# Altium PCB IC_Card_Access.PcbDoc
Units mil, origin at the board's own origin, x right, y up, seen from the top; angles counter-clockwise.
Board outline 5257.68 x 6780 mil, 2 copper layers (Top Layer, Bottom Layer), stack 62.206 mil thick; 51 components, 52 nets, 246 pads, 142 vias.
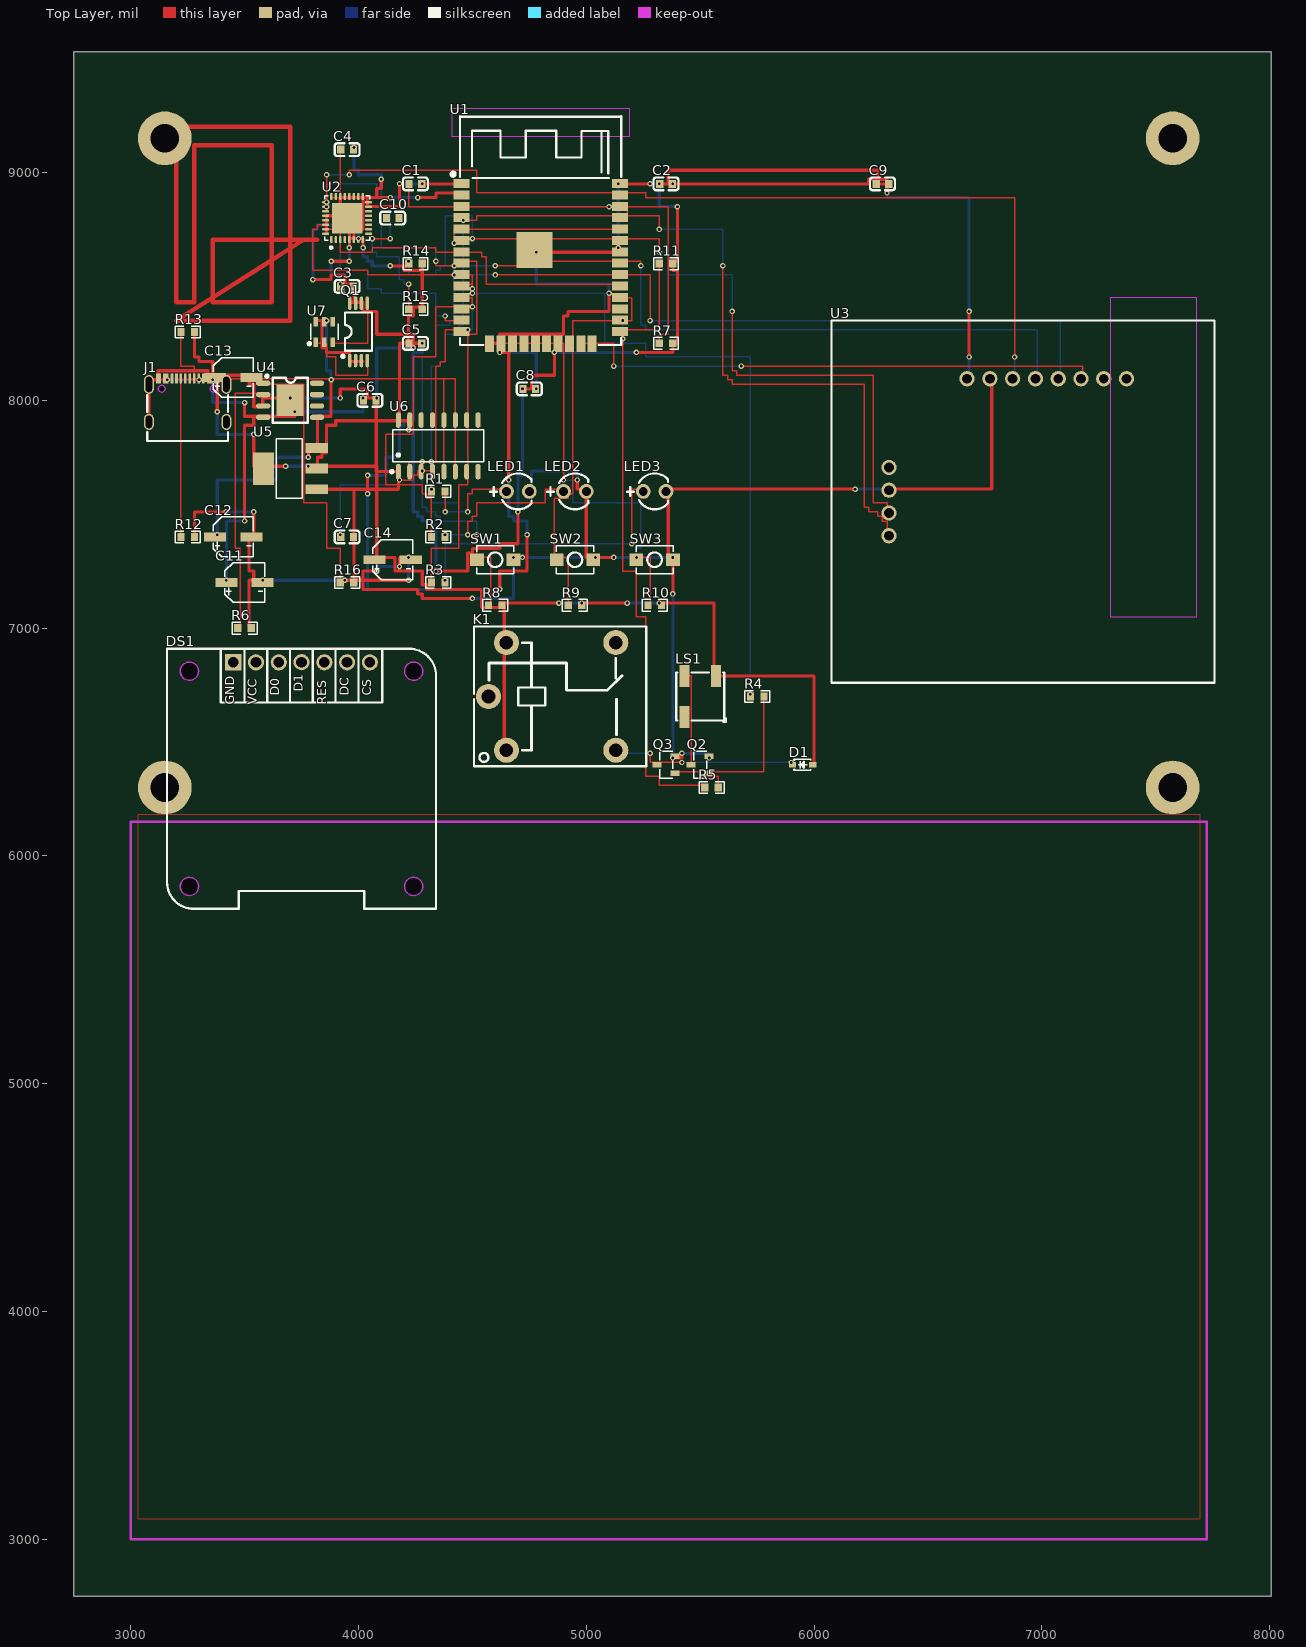
[diagram p0: Top Layer view]
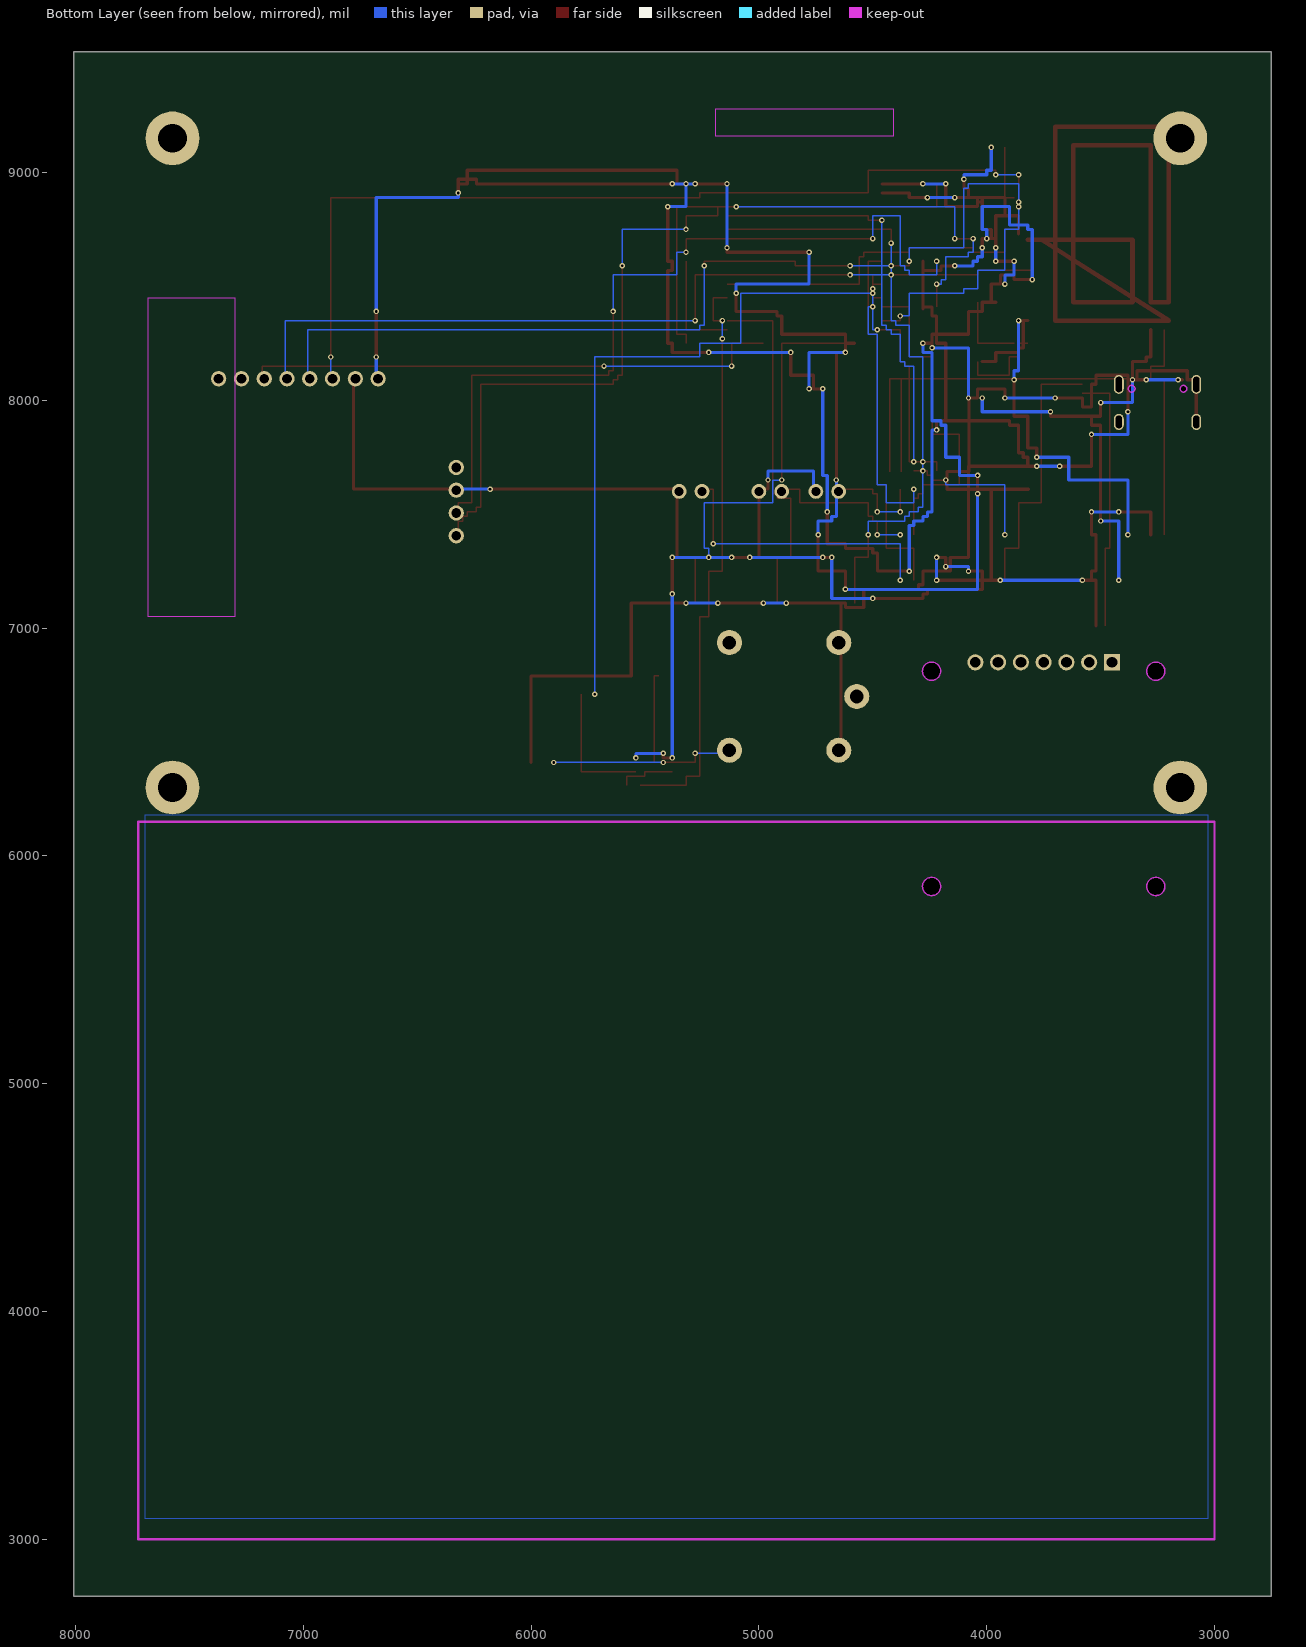
[diagram p1: Bottom Layer view, seen from below]

## Layer stack, top to bottom
Top Solder Mask Layer: solder mask 0.394, Dk 3.3
Top Layer: signal copper 1.379
Dielectric1: surface 59.449, FR4, Dk 4.5
Bottom Layer: signal copper 1.378
Bottom Solder Mask Layer: solder mask 0.394, Dk 3.3

## Board outline
8007.68,2750 2750,2750 2750,9530 8007.68,9530

## Design rules (kind name [scope] priority, off if disabled: settings)
BoardOutlineClearance copperThickness2oz_1 [All] p2 off: genericclearance=7.99 ignorepadtopadclearanceinfootprint=FALSE except(0: Arc-SplitContinuation Track-SplitContinuation SMDPad-SplitContinuation THPad-SplitContinuation Via-SplitContinuation Fill-SplitContinuation Region-SplitContinuation Poly-SplitContinuation Text-SplitContinuation Hole-SplitContinuation; 5.98: Arc-CutoutEdge SMDPad-CutoutEdge THPad-CutoutEdge Via-CutoutEdge Fill-CutoutEdge Region-CutoutEdge Text-CutoutEdge; 6.93: Hole-OutlineEdge Hole-CutoutEdge; 10: Poly-OutlineEdge Poly-CutoutEdge; 11.81: Arc-OutlineEdge Track-OutlineEdge SMDPad-OutlineEdge THPad-OutlineEdge Via-OutlineEdge Fill-OutlineEdge Region-OutlineEdge Text-OutlineEdge Track-CutoutEdge)
BoardOutlineClearance copperThickness1oz_1 [All] p4: genericclearance=4.02 ignorepadtopadclearanceinfootprint=FALSE except(0: Arc-SplitContinuation Track-SplitContinuation SMDPad-SplitContinuation THPad-SplitContinuation Via-SplitContinuation Fill-SplitContinuation Region-SplitContinuation Poly-SplitContinuation Text-SplitContinuation Hole-SplitContinuation; 6: SMDPad-CutoutEdge THPad-CutoutEdge Via-CutoutEdge Fill-CutoutEdge Region-CutoutEdge Text-CutoutEdge; 6.93: Hole-OutlineEdge Hole-CutoutEdge; 10: Poly-OutlineEdge Poly-CutoutEdge; 11.8: Arc-OutlineEdge Track-OutlineEdge SMDPad-OutlineEdge THPad-OutlineEdge Via-OutlineEdge Fill-OutlineEdge Region-OutlineEdge Text-OutlineEdge; 11.81: Arc-CutoutEdge Track-CutoutEdge)
Clearance copperThickness2oz [All] p1 off: gap=7.99 ignorepadtopadclearanceinfootprint=FALSE except(5.98: SMDPad-Track SMDPad-SMDPad THPad-Track SMDPad-THPad THPad-THPad Track-Via SMDPad-Via THPad-Via Via-Via Fill-Track Region-Track Fill-SMDPad Region-SMDPad Fill-THPad Region-THPad Fill-Via Region-Via Fill-Fill Fill-Region Region-Region Arc-Track Arc-SMDPad Arc-THPad Arc-Via Fill-Arc Region-Arc Arc-Arc Text-Track SMDPad-Text Text-THPad Text-Via Fill-Text Region-Text Arc-Text Text-Text; 6.93: Hole-Track Hole-SMDPad Hole-THPad Hole-Via Fill-Hole Region-Hole Hole-Arc Hole-Text; 10: Poly-Track Poly-SMDPad Poly-THPad Poly-Via Poly-Fill Poly-Region Poly-Poly Poly-Arc Poly-Text Poly-Hole)
Clearance copperThickness1oz [All] p3: gap=4.02 ignorepadtopadclearanceinfootprint=FALSE except(5.98: SMDPad-Track SMDPad-SMDPad THPad-Track SMDPad-THPad THPad-THPad Track-Via SMDPad-Via THPad-Via Via-Via Fill-Track Region-Track Fill-SMDPad Region-SMDPad Fill-THPad Region-THPad Fill-Via Region-Via Fill-Fill Fill-Region Region-Region; 6: Arc-Track Arc-SMDPad Arc-THPad Arc-Via Fill-Arc Region-Arc Arc-Arc Text-Track SMDPad-Text Text-THPad Text-Via Fill-Text Region-Text Arc-Text Text-Text; 6.93: Hole-Track Hole-SMDPad Hole-THPad Hole-Via Fill-Hole Region-Hole Hole-Arc Hole-Text; 10: Poly-Track Poly-SMDPad Poly-THPad Poly-Via Poly-Fill Poly-Region Poly-Poly Poly-Arc Poly-Text Poly-Hole)
Creepage creepage [All] p1: checkdistance=0 ignoreinternallayers=TRUE applytopolygonpour=TRUE
DiffPairsRouting differentialPair [All] p1: maxlimit=6 minlimit=6 mostfreqgap=6 toplayer_minwidth=5 toplayer_prefwidth=10 toplayer_maxwidth=100 toplayer_mingap=6 toplayer_prefgap=6 toplayer_maxgap=6 bottomlayer_minwidth=5 bottomlayer_prefwidth=10 bottomlayer_maxwidth=100 bottomlayer_mingap=6 bottomlayer_prefgap=6 bottomlayer_maxgap=6 maxuncoupledlength=10
HoleToHoleClearance otherClearance [All] p1: gap=11.81 allowstackedmicrovias=TRUE
Length netLength [All] p1: minlimit=0 maxlimit=0
MatchedLengths netLengthTolerance [All] p1: tolerance=1000
PasteMaskExpansion pasteMaskExpansion [All] p1: expansion=0
PlaneConnect innerPlane [All] p1: planeconnectstyle=Relief reliefexpansion=20 reliefentries=4 reliefconductorwidth=10 reliefairgap=10
PolygonConnect copperRegion [All] p1: connectstyle=Relief reliefconductorwidth=10 reliefentries=4 polygonreliefangle="90 Angle" airgapwidth=10 via.connectstyle=Relief via.reliefconductorwidth=10 via.reliefentries=4 via.polygonreliefangle="90 Angle" via.airgapwidth=10
RoutingVias viaSize [All] p1: holewidth=12.01 width=24.02 viastyle="Through Hole" minholewidth=11.81 minwidth=19.68 maxholewidth=248.03 maxwidth=393.7
SolderMaskExpansion solderMaskExpansion [IsVia] p1: expansion=-1000 istentingtop=TRUE
SolderMaskExpansion solderMaskExpansion [All] p2: expansion=2 istentingtop=FALSE
Width copperThickness2oz_2 [All] p1 off: maxlimit=100 minlimit=8 preferedwidth=10
Width copperThickness1oz_2 [All] p2: maxlimit=100 minlimit=5 preferedwidth=10

## Components (designator, comment, footprint, x,y, rotation, side; value= is the part's Value field where it differs from the comment)
C1 "100nF" C0603 4250,8950 r0 top
C2 "100nF" C0603 5350,8950 r0 top
C3 "100nF" C0603 3950,8500 r0 top
C4 "100nF" C0603 3950,9100 r0 top
C5 "100nF" C0603 4250,8250 r0 top
C6 "100nF" C0603 4050,8000 r0 top
C7 "100nF" C0603 3950,7400 r0 top
C8 "100nF" C0603 4750,8050 r0 top
C9 "100nF" C0603 6300,8950 r0 top
C10 "15pF" C0603 4150,8800 r0 top
C11 "CAP-SMD 4*5 10uF ±10% 16V" CAP-SMD_BD4.0-L4.3-W4.3-LS5.3-FD 3500,7200 r0 top
C12 "CAP-SMD 4*5 10uF ±10% 16V" CAP-SMD_BD4.0-L4.3-W4.3-LS5.3-FD 3450,7400 r0 top
C13 "CAP-SMD 4*5 10uF ±10% 16V" CAP-SMD_BD4.0-L4.3-W4.3-LS5.3-FD 3450,8100 r0 top
C14 "CAP-SMD 4*5 10uF ±10% 16V" CAP-SMD_BD4.0-L4.3-W4.3-LS5.3-FD 4150,7300 r0 top
D1 "SS14" SOD-323_L1.7-W1.3-LS2.6-RD-1 5950,6400 r0 top
DS1 "JX040102-1" OLED-TH_JX040101-1 3750,6850 r0 top
J1 "UCB11L69P16" TYPE-C-SMD_16P-UCB11L69P16 3250,8000 r0 top
K1 "SRD-03VDC-SL-C" RELAY-TH_SRD-XXVDC-XL-C 4850,6700 r0 top
LED1 "LED" LED-TH_BD4.0-P2.54-FD_RED 4700,7600 r0 top
LED2 "LED" LED-TH_BD4.0-P2.54-FD_RED 4950,7600 r0 top
LED3 "LED" LED-TH_BD4.0-P2.54-FD_RED 5300,7600 r0 top
LS1 "BEEP_SMT" BUZ-SMD_3P-L5.2-W5.2-P3.50-BR 5500,6700 r0 top
Q1 "FS8205A" TSSOP-8_L4.4-W3.0-P0.65-LS6.4-BL-2 4000,8300 r0 top
Q2 "S8050" SOT-23-3_L2.9-W1.3-P1.90-LS2.4-BR 5500,6400 r0 top
Q3 "S8050" SOT-23-3_L2.9-W1.3-P1.90-LS2.4-BR 5350,6400 r0 top
R1 "1k" R0603 4350,7600 r0 top
R2 "1k" R0603 4350,7400 r0 top
R3 "1k" R0603 4350,7200 r0 top
R4 "1k" R0603 5750,6700 r0 top
R5 "1k" R0603 5550,6300 r0 top
R6 "10k" R0603 3500,7000 r0 top
R7 "10k" R0603 5350,8250 r0 top
R8 "10k" R0603 4600,7100 r0 top
R9 "10k" R0603 4950,7100 r0 top
R10 "10k" R0603 5300,7100 r0 top
R11 "10k" R0603 5350,8600 r0 top
R12 "5.1k" R0603 3250,7400 r0 top
R13 "5.1k" R0603 3250,8300 r0 top
R14 "10k" R0603 4250,8600 r0 top
R15 "10k" R0603 4250,8400 r0 top
R16 "10k" R0603 3950,7200 r0 top
SW1 "轻触按键3*4*H" SW-SMD_L4.0-W2.9-LS5.0 4600,7300 r0 top
SW2 "轻触按键3*4*H" SW-SMD_L4.0-W2.9-LS5.0 4950,7300 r0 top
SW3 "轻触按键3*4*H" SW-SMD_L4.0-W2.9-LS5.0 5300,7300 r0 top
U1 "ESP32-WROOM-32" WIFIM-SMD_ESP-WROOM-32 4800,8600 r0 top
U2 "13.56MHz" QFN-32_L5.0-W5.0-P0.50-BL-EP3.4 3950,8800 r0 top
U3 "PN532 NFC RFID Module v4" COMM-TH_L42.7-W40.4_PN532_NFC_RFID 6850,7750 r0 top
U4 "TP4056X-42-ESOP8" SOP-8_L4.9-W3.9-P1.27-LS6.0-TL-EP 3700,8000 r0 top
U5 "AMS1117-3.3V" SOT-223-3_L6.5-W3.4-P2.30-LS7.0-BR 3700,7700 r0 top
U6 "CH340C" SOP-16_L10.0-W3.9-P1.27-LS6.0-BL 4350,7800 r0 top
U7 "DW01" SOT-23-6_L2.9-W1.6-P0.95-LS2.8-BL 3850,8300 r0 top

## Footprints (in the part's own frame and the unit in brackets; to place one, negate y for a bottom-side part, rotate by r counter-clockwise, add the part's x,y. Pads: shape width x height; smd on the part's side, far side on the other; paste and mask are expansions set on the pad)
BUZ-SMD_3P-L5.2-W5.2-P3.50-BR [mm]
  rect 1.12x2.425 smd: 1(1.75,2.288) 2(-1.75,2.288) 3(-1.75,-2.288)
  silkscreen extent -2.68,-2.9 2.9,2.68
C0603 [mm]
  rect 0.8x0.9 smd: 1(-0.7,0) 2(0.7,0)
  silkscreen extent -1.39,-0.71 1.39,0.71
CAP-SMD_BD4.0-L4.3-W4.3-LS5.3-FD [mm]
  rect 2.46x0.98 smd: 1(-2.02,0) 2(2.02,0)
  silkscreen extent -2.23,-2.23 2.23,2.23
COMM-TH_L42.7-W40.4_PN532_NFC_RFID [mm]
  round 1.7 hole 1.1: 1(-4.535,8.755) 2(-1.995,8.755) 3(0.545,8.755) 4(3.085,8.755) 5(5.625,8.755) 6(8.165,8.755) 7(10.705,8.755) 8(13.245,8.755) 9(-13.245,-1.135) 10(-13.245,-3.675) 11(-13.245,-6.215) 12(-13.245,-8.755)
  silkscreen extent -19.64,-25.14 23.05,15.25
LED-TH_BD4.0-P2.54-FD_RED [mil]
  round 65 hole 39.37: 1(-50,0) 2(50,0)
  silkscreen extent -122,-79 59,79
OLED-TH_JX040101-1 [mm]
  rect 1.8x1.8 hole 1.2 paste+0 mask+0.05: 1(-7.619,0.001)
  round 1.8 hole 1.2 paste+0 mask+0.05: 2(-5.079,-0.004) 3(-2.539,-0.004) 4(0.001,0.004) 5(2.539,-0.001) 6(5.079,-0.001) 7(7.619,-0.004)
  Board Outline Layer circle w0.003: c-12.501,-24.997 r1.016
  Board Outline Layer circle w0.003: c12.498,-24.997 r1.016
  Board Outline Layer circle w0.003: c12.498,-0.997 r1.016
  Board Outline Layer circle w0.003: c-12.501,-0.997 r1.016
  Board Outline Layer region: -11.485,-24.997 -11.585,-25.438 -11.867,-25.792 -12.275,-25.988 -12.727,-25.988 -13.134,-25.792 -13.416,-25.438 -13.517,-24.997 -13.517,-24.997 -13.416,-24.557 -13.134,-24.203 -12.727,-24.007 -12.275,-24.007 -11.867,-24.203 -11.585,-24.557 -11.485,-24.997
  Board Outline Layer region: -11.485,-24.997 -11.494,-25.136 -11.522,-25.272 -11.569,-25.402 -11.633,-25.525 -11.712,-25.639 -11.807,-25.74 -11.915,-25.827 -12.033,-25.9 -12.16,-25.955 -12.294,-25.992 -12.431,-26.011 -12.57,-26.011 -12.707,-25.992 -12.841,-25.955 -12.968,-25.9 -13.087,-25.827 -13.194,-25.74 -13.289,-25.639 -13.369,-25.525 -13.432,-25.402 -13.479,-25.272 -13.507,-25.136 -13.517,-24.997 -13.507,-24.859 -13.479,-24.723 -13.432,-24.593 -13.369,-24.47 -13.289,-24.356 -13.194,-24.255 -13.087,-24.167 -12.968,-24.095 -12.841,-24.04 -12.707,-24.003 -12.57,-23.984 -12.431,-23.984 -12.294,-24.003 -12.16,-24.04 -12.033,-24.095 -11.915,-24.167 -11.807,-24.255 -11.712,-24.356 -11.633,-24.47 -11.569,-24.593 -11.522,-24.723 -11.494,-24.859
  Board Outline Layer region: 13.514,-24.997 13.413,-25.438 13.132,-25.792 12.724,-25.988 12.272,-25.988 11.865,-25.792 11.583,-25.438 11.482,-24.997 11.482,-24.997 11.583,-24.557 11.865,-24.203 12.272,-24.007 12.724,-24.007 13.132,-24.203 13.413,-24.557 13.514,-24.997
  Board Outline Layer region: 13.514,-24.997 13.505,-25.136 13.476,-25.272 13.43,-25.402 13.366,-25.525 13.286,-25.639 13.192,-25.74 13.084,-25.827 12.965,-25.9 12.838,-25.955 12.705,-25.992 12.567,-26.011 12.429,-26.011 12.291,-25.992 12.158,-25.955 12.031,-25.9 11.912,-25.827 11.805,-25.74 11.71,-25.639 11.63,-25.525 11.566,-25.402 11.52,-25.272 11.492,-25.136 11.482,-24.997 11.492,-24.859 11.52,-24.723 11.566,-24.593 11.63,-24.47 11.71,-24.356 11.805,-24.255 11.912,-24.167 12.031,-24.095 12.158,-24.04 12.291,-24.003 12.429,-23.984 12.567,-23.984 12.705,-24.003 12.838,-24.04 12.965,-24.095 13.084,-24.167 13.192,-24.255 13.286,-24.356 13.366,-24.47 13.43,-24.593 13.476,-24.723 13.505,-24.859
  Board Outline Layer region: 13.514,-0.997 13.413,-1.438 13.132,-1.791 12.724,-1.987 12.272,-1.987 11.865,-1.791 11.583,-1.438 11.482,-0.997 11.482,-0.997 11.583,-0.556 11.865,-0.203 12.272,-0.006 12.724,-0.006 13.132,-0.203 13.413,-0.556 13.514,-0.997
  Board Outline Layer region: 13.514,-0.997 13.505,-1.135 13.476,-1.271 13.43,-1.402 13.366,-1.525 13.286,-1.638 13.192,-1.739 13.084,-1.827 12.965,-1.899 12.838,-1.954 12.705,-1.992 12.567,-2.011 12.429,-2.011 12.291,-1.992 12.158,-1.954 12.031,-1.899 11.912,-1.827 11.805,-1.739 11.71,-1.638 11.63,-1.525 11.566,-1.402 11.52,-1.271 11.492,-1.135 11.482,-0.997 11.492,-0.859 11.52,-0.723 11.566,-0.592 11.63,-0.469 11.71,-0.356 11.805,-0.254 11.912,-0.167 12.031,-0.095 12.158,-0.04 12.291,-0.002 12.429,0.017 12.567,0.017 12.705,-0.002 12.838,-0.04 12.965,-0.095 13.084,-0.167 13.192,-0.254 13.286,-0.356 13.366,-0.469 13.43,-0.592 13.476,-0.723 13.505,-0.859
  Board Outline Layer region: -11.485,-0.997 -11.585,-1.438 -11.867,-1.791 -12.275,-1.987 -12.727,-1.987 -13.134,-1.791 -13.416,-1.438 -13.517,-0.997 -13.517,-0.997 -13.416,-0.556 -13.134,-0.203 -12.727,-0.006 -12.275,-0.006 -11.867,-0.203 -11.585,-0.556 -11.485,-0.997
  Board Outline Layer region: -11.485,-0.997 -11.494,-1.135 -11.522,-1.271 -11.569,-1.402 -11.633,-1.525 -11.712,-1.638 -11.807,-1.739 -11.915,-1.827 -12.033,-1.899 -12.16,-1.954 -12.294,-1.992 -12.431,-2.011 -12.57,-2.011 -12.707,-1.992 -12.841,-1.954 -12.968,-1.899 -13.087,-1.827 -13.194,-1.739 -13.289,-1.638 -13.369,-1.525 -13.432,-1.402 -13.479,-1.271 -13.507,-1.135 -13.517,-0.997 -13.507,-0.859 -13.479,-0.723 -13.432,-0.592 -13.369,-0.469 -13.289,-0.356 -13.194,-0.254 -13.087,-0.167 -12.968,-0.095 -12.841,-0.04 -12.707,-0.002 -12.57,0.017 -12.431,0.017 -12.294,-0.002 -12.16,-0.04 -12.033,-0.095 -11.915,-0.167 -11.807,-0.254 -11.712,-0.356 -11.633,-0.469 -11.569,-0.592 -11.522,-0.723 -11.494,-0.859
  Multi-Layer board cut-out: -11.485,-24.997 -11.585,-25.438 -11.867,-25.792 -12.275,-25.988 -12.727,-25.988 -13.134,-25.792 -13.416,-25.438 -13.517,-24.997 -13.517,-24.997 -13.416,-24.557 -13.134,-24.203 -12.727,-24.007 -12.275,-24.007 -11.867,-24.203 -11.585,-24.557 -11.485,-24.997
  Multi-Layer board cut-out: 13.514,-24.997 13.413,-25.438 13.132,-25.792 12.724,-25.988 12.272,-25.988 11.865,-25.792 11.583,-25.438 11.482,-24.997 11.482,-24.997 11.583,-24.557 11.865,-24.203 12.272,-24.007 12.724,-24.007 13.132,-24.203 13.413,-24.557 13.514,-24.997
  Multi-Layer board cut-out: 13.514,-0.997 13.413,-1.438 13.132,-1.791 12.724,-1.987 12.272,-1.987 11.865,-1.791 11.583,-1.438 11.482,-0.997 11.482,-0.997 11.583,-0.556 11.865,-0.203 12.272,-0.006 12.724,-0.006 13.132,-0.203 13.413,-0.556 13.514,-0.997
  Multi-Layer board cut-out: -11.485,-0.997 -11.585,-1.438 -11.867,-1.791 -12.275,-1.987 -12.727,-1.987 -13.134,-1.791 -13.416,-1.438 -13.517,-0.997 -13.517,-0.997 -13.416,-0.556 -13.134,-0.203 -12.727,-0.006 -12.275,-0.006 -11.867,-0.203 -11.585,-0.556 -11.485,-0.997
  silkscreen extent -15,-27.5 15,1.5
QFN-32_L5.0-W5.0-P0.50-BL-EP3.4 [mm]
  oval 0.28x0.8 smd paste+0 mask+0.05: 1(-1.75,-2.4) 2(-1.25,-2.4) 3(-0.75,-2.4) 4(-0.25,-2.4) 5(0.25,-2.4) 6(0.75,-2.4) 7(1.25,-2.4) 8(1.75,-2.4) 17(1.75,2.4) 18(1.25,2.4) 19(0.75,2.4) 20(0.25,2.4) 21(-0.25,2.4) 22(-0.75,2.4) 23(-1.25,2.4) 24(-1.75,2.4)
  oval 0.8x0.28 smd paste+0 mask+0.05: 9(2.4,-1.75) 10(2.4,-1.25) 11(2.4,-0.75) 12(2.4,-0.25) 13(2.4,0.25) 14(2.4,0.75) 15(2.4,1.25) 16(2.4,1.75) 25(-2.4,1.75) 26(-2.4,1.25) 27(-2.4,0.75) 28(-2.4,0.25) 29(-2.4,-0.25) 30(-2.4,-0.75) 31(-2.4,-1.25) 32(-2.4,-1.75)
  rect 3.4x3.4 smd paste+0 mask+0.05: 33(0,0)
  silkscreen extent -2.5,-3.43 2.5,2.5
R0603 [mil]
  rect 31.75x34.02 smd paste-3937.01 mask+2: 1(-29.66,0) 2(29.66,0)
  silkscreen extent -55,-26 55,26
RELAY-TH_SRD-XXVDC-XL-C [mil]
  round 110 hole 60: 1(-200.79,-236.22) 2(279.52,-236.2) 3(279.53,236.2) 4(-200.79,236.22) 5(-279.53,0)
  silkscreen extent -342,-307 413,307
SOD-323_L1.7-W1.3-LS2.6-RD-1 [mm]
  rect 0.83x0.63 smd paste+0 mask+0.05: 1(-1.14,0) 2(1.14,0)
  silkscreen extent -1.02,-0.64 0.89,0.64
SOP-8_L4.9-W3.9-P1.27-LS6.0-TL-EP [mm]
  oval 1.6x0.6 smd: 1(-3,1.905) 2(-3,0.635) 3(-3,-0.635) 4(-3,-1.905) 5(3,-1.905) 6(3,-0.635) 7(3,0.635) 8(3,1.905)
  rect 3x3.5 smd: 9(0,0)
  silkscreen extent -2.74,-2.5 1.95,2.84
SOP-16_L10.0-W3.9-P1.27-LS6.0-BL [mm]
  oval 0.56x1.745 smd: 1(-4.445,-2.872) 2(-3.175,-2.872) 3(-1.905,-2.872) 4(-0.635,-2.872) 5(0.635,-2.872) 6(1.905,-2.872) 7(3.175,-2.872) 8(4.445,-2.872) 9(4.445,2.872) 10(3.175,2.872) 11(1.905,2.872) 12(0.635,2.872) 13(-0.635,2.872) 14(-1.905,2.872) 15(-3.175,2.872) 16(-4.445,2.872)
  silkscreen extent -5.33,-3.02 5.08,1.77
SOT-23-3_L2.9-W1.3-P1.90-LS2.4-BR [mm]
  rect 1x0.65 smd: 1(1,-0.95) 2(1,0.95) 3(-1,0)
  silkscreen extent -0.73,-1.53 0.73,1.53
SOT-23-6_L2.9-W1.6-P0.95-LS2.8-BL [mil]
  rect 20.95x42.2 smd: 1(-37.4,-45.24) 2(0,-45.24) 3(37.4,-45.24) 4(37.4,45.24) 5(0,45.24) 6(-37.4,45.24)
  silkscreen extent -72,-57 61,35
SOT-223-3_L6.5-W3.4-P2.30-LS7.0-BR [mm]
  rect 2.5x1.1 smd: 1(2.97,-2.3) 2(2.97,0) 3(2.97,2.3)
  rect 2.34x3.6 smd: 4(-2.97,0)
  silkscreen extent -1.57,-3.33 1.37,3.33
SW-SMD_L4.0-W2.9-LS5.0 [mm]
  rect 1.53x1.36 smd: 1(-2.035,0) 2(2.035,0)
  silkscreen extent -2.08,-1.58 2.08,1.58
TSSOP-8_L4.4-W3.0-P0.65-LS6.4-BL-2 [mm]
  oval 0.4x1.5 smd: 1(-0.975,-3.2) 2(-0.325,-3.2) 3(0.325,-3.2) 4(0.975,-3.2) 5(0.975,3.2) 6(0.325,3.2) 7(-0.325,3.2) 8(-0.975,3.2)
  silkscreen extent -1.89,-2.87 1.5,2.16
TYPE-C-SMD_16P-UCB11L69P16 [mm]
  oval 1.1x1.8 hole 0.7 slot 1.4 at 90 deg: 1(-4.32,-2.416) 1(4.32,-2.416)
  oval 1.1x2.1 hole 0.7 slot 1.7 at 90 deg: 1(-4.32,1.764) 1(4.32,1.764)
  rect 0.3x1.14 smd paste-100 mask+0.051: A1(-3.4,2.415) A4(-2.6,2.415) A5(-1.25,2.415) A6(-0.25,2.415) A7(0.25,2.415) A8(1.25,2.416) A9(2.6,2.415) A12(3.4,2.415) B1(3.1,2.415) B4(2.3,2.415) B5(1.75,2.415) B6(0.75,2.415) B7(-0.75,2.415) B8(-1.75,2.416) B9(-2.3,2.415) B12(-3.1,2.415)
  Board Outline Layer circle w0.003: c-2.89,1.285 r0.375
  Board Outline Layer circle w0.003: c2.89,1.285 r0.375
  Board Outline Layer region: -2.515,1.285 -2.552,1.122 -2.656,0.991 -2.807,0.919 -2.973,0.919 -3.124,0.991 -3.228,1.122 -3.265,1.285 -3.265,1.285 -3.228,1.447 -3.124,1.578 -2.973,1.65 -2.807,1.65 -2.656,1.578 -2.552,1.447 -2.515,1.285
  Board Outline Layer region: -2.515,1.285 -2.524,1.201 -2.552,1.122 -2.597,1.051 -2.656,0.991 -2.727,0.947 -2.807,0.919 -2.89,0.91 -2.973,0.919 -3.053,0.947 -3.124,0.991 -3.183,1.051 -3.228,1.122 -3.256,1.201 -3.265,1.285 -3.256,1.368 -3.228,1.447 -3.183,1.518 -3.124,1.578 -3.053,1.622 -2.973,1.65 -2.89,1.66 -2.807,1.65 -2.727,1.622 -2.656,1.578 -2.597,1.518 -2.552,1.447 -2.524,1.368
  Board Outline Layer region: 3.265,1.285 3.228,1.122 3.124,0.991 2.973,0.919 2.807,0.919 2.656,0.991 2.552,1.122 2.515,1.285 2.515,1.285 2.552,1.447 2.656,1.578 2.807,1.65 2.973,1.65 3.124,1.578 3.228,1.447 3.265,1.285
  Board Outline Layer region: 3.265,1.285 3.256,1.201 3.228,1.122 3.183,1.051 3.124,0.991 3.053,0.947 2.973,0.919 2.89,0.91 2.807,0.919 2.727,0.947 2.656,0.991 2.597,1.051 2.552,1.122 2.524,1.201 2.515,1.285 2.524,1.368 2.552,1.447 2.597,1.518 2.656,1.578 2.727,1.622 2.807,1.65 2.89,1.66 2.973,1.65 3.053,1.622 3.124,1.578 3.183,1.518 3.228,1.447 3.256,1.368
  Multi-Layer board cut-out: -2.515,1.285 -2.552,1.122 -2.656,0.991 -2.807,0.919 -2.973,0.919 -3.124,0.991 -3.228,1.122 -3.265,1.285 -3.265,1.285 -3.228,1.447 -3.124,1.578 -2.973,1.65 -2.807,1.65 -2.656,1.578 -2.552,1.447 -2.515,1.285
  Multi-Layer board cut-out: 3.265,1.285 3.228,1.122 3.124,0.991 2.973,0.919 2.807,0.919 2.656,0.991 2.552,1.122 2.515,1.285 2.515,1.285 2.552,1.447 2.656,1.578 2.807,1.65 2.973,1.65 3.124,1.578 3.228,1.447 3.265,1.285
  silkscreen extent -4.5,-4.54 4.5,0.58
WIFIM-SMD_ESP-WROOM-32 [mm]
  rect 1.8x1.001 smd: 1(-8.851,8.93) 2(-8.851,7.66) 3(-8.851,6.39) 4(-8.851,5.12) 5(-8.851,3.85) 6(-8.851,2.58) 7(-8.851,1.31) 8(-8.851,0.04) 9(-8.851,-1.23) 10(-8.851,-2.5) 11(-8.851,-3.77) 12(-8.851,-5.04) 13(-8.851,-6.31) 14(-8.851,-7.58) 25(8.851,-7.58) 26(8.851,-6.31) 27(8.851,-5.04) 28(8.851,-3.77) 29(8.851,-2.5) 30(8.851,-1.23) 31(8.851,0.04) 32(8.851,1.31) 33(8.851,2.58) 34(8.851,3.85) 35(8.851,5.12) 36(8.851,6.39) 37(8.851,7.66) 38(8.851,8.93)
  rect 1.001x1.8 smd: 15(-5.69,-8.93) 16(-4.42,-8.93) 17(-3.15,-8.93) 18(-1.88,-8.93) 19(-0.61,-8.93) 20(0.66,-8.93) 21(1.93,-8.93) 22(3.2,-8.93) 23(4.47,-8.93) 24(5.74,-8.93)
  rect 4x4 smd: 39(-0.7,1.52)
  silkscreen extent -9.97,-9.08 8.99,16.42

## Free pads (board coordinates)
  round 236 hole 126 unplated: H1(3150,6300) H2(7574,6300) H3(3150,9150) H4(7574,9150)

## Via types
v1: diameter 24, hole 12, Top Layer to Bottom Layer, 142 vias

## Nets (pads, with @x,y where several pads share a name; then routed paths per layer and width w, separated by ;. In a path a pad name is that pad's centre, name@x,y a point inside that pad or via, vN(x,y) a via of type N, cw(c..) or ccw(c..) an arc to the next point about the centre after c; other vN are vias at no path point)
+3V3: C2.1 C3.1 C5.1 C8.1 C9.1 C13.1 C14.1 D1.2 K1.1 LS1.1 R7.2 R8.2 R9.2 R10.2 R11.2 R14.2 R15.2 U1.2 U2.6 U2.16 U2.17 U2.19 U3.1 U5.2 U5.4 U6.16 | length 13960
  Top Layer w14: v1(3380,7950) C13.1@3380,8110 ; v1(3540,7850) 3540,7710 3580,7710 v1(3680,7710) ; v1(3780,7710) U5.2@3820,7710 ; v1(3880,8610) v1(3960,8610) ; v1(3960,8670) 3960,8710 U2.6@3980,8710 ; U2.19@3980,8890 4020,8890 4020,8870 ; v1(4020,8670) 4020,8710 U2.6@3980,8710 ; v1(4140,8590) 4200,8590 4200,8570 4279.7,8570 ; v1(4140,8890) 4040,8890 4040,8870 4020,8870 ; v1(4220,7870) 4220,7910 U6.16@4180,7910 ; v1(4260,8890) 4340,8890 4340,8910 U1.2@4460,8910 ; R15.2 R15.2@4279.7,8410 ; R14.2 4279.7,8570 ; R15.2@4280,8410 R15.2@4279.7,8410 ; R14.2@4280,8610 4280,8570 4279.7,8570 ; v1(4340,7250) 4480,7250 4480,7330 4500,7330 4500,7350 4620,7350 4620,7370 4700,7370 v1(4700,7510) ; K1.1@4640,6470 R8.2@4640,7110 ; v1(4720,8050) 4760,8050 4760,8110 4860,8110 v1(4860,8210) ; v1(4880,7110) R8.2@4640,7110 ; v1(4980,7110) v1(5180,7110) ; v1(5220,8210) 5380,8210 5380,8250 5400,8250 5400,8570 5380,8570 5380,8610 5400,8610 v1(5400,8850) ; v1(5320,7110) 5560,7110 5560,6790 6000,6790 D1.2@6000,6410 ; v1(5320,8950) 5360,8950 5360,9010 6280,9010 6280,8950 6320,8950 v1(6320,8910) ; v1(6680,8190) v1(6680,8390) ; U5.2@3820,7710 3820,7750 3840,7750 3840,7770 3860,7770 3860,7890 3900,7890 3900,7910 U6.16@4180,7910 ; U5.2@3820,7710 4080,7710 4080,7310 4160,7310 4160,7250 4280,7250 4280,7190 4300,7190 4300,7170 4540,7170 4540,7090 4620,7090 4620,7110 R8.2@4640,7110 ; U2.6@3980,8710 3980,8750 4020,8750 4020,8870 ; U6.16@4180,7910 4180,8250 4220,8250 4220,8370 4240,8370 4240,8410 R15.2@4279.7,8410 ; R15.2@4279.7,8410 4279.7,8570
  Bottom Layer w14: v1(3380,7950) 3380,7850 v1(3540,7850) ; v1(3680,7710) v1(3780,7710) ; v1(3880,8610) 3880,8550 3920,8550 v1(3920,8510) ; v1(3960,8610) v1(3960,8670) ; v1(4020,8670) 4020,8630 4040,8630 4040,8610 4060,8610 4060,8590 v1(4140,8590) ; v1(4140,8890) v1(4260,8890) ; v1(4220,7870) 4240,7870 4240,7510 4260,7510 4260,7490 4280,7490 4280,7470 4320,7470 4320,7450 4340,7450 v1(4340,7250) ; v1(4700,7510) 4700,7670 4720,7670 v1(4720,8050) ; v1(4860,8210) v1(5220,8210) ; v1(4880,7110) v1(4980,7110) ; v1(5180,7110) v1(5320,7110) ; v1(5320,8950) 5320,8850 v1(5400,8850) ; v1(6320,8910) 6320,8890 6680,8890 v1(6680,8390) ; v1(6680,8090) v1(6680,8190)
ANT1: C10.2 U2.5 U2.8 | length 6077.6
  Top Layer w20: 3818.9,8705.5 3759.9,8705.5 ; 3360,8451.59 3360,8430 3620,8430 3620,8616.67 ; 3360,8451.59 3360,8705.5 3620,8705.5 ; 3360,8451.59 3620,8616.67 ; 3360,8451.59 3200,8350 3700,8350 3700,8667.47 ; 3620,8616.67 3700,8667.47 ; 3620,8616.67 3620,8705.5 ; 3620,8705.5 3700,8705.5 ; 3620,8705.5 3620,9120 3280,9120 3280,8430 3200,8430 3200,9200 3700,9200 3700,8705.5 ; 3700,8667.47 3759.9,8705.5 ; 3700,8667.47 3700,8705.5 ; 3700,8705.5 3759.9,8705.5
ANT_RX: C10.1 U2.23
BAT_GND: Q1.1 Q1.2 Q1.3 U7.6 | length 380
  Top Layer w14: U7.6@3820,8350 3840,8350 3840,8230 3860,8230 3860,8210 3960,8210 3960,8170 Q1.3@4020,8170
BOOT: R11.1 U1.25 | length 480
  Top Layer w6: U1.25@5140,8310 5320,8310 R11.1@5320,8610
BUZ: R4.1 U1.10 | length 3060
  Top Layer w6: U1.10@4460,8510 4500,8510 v1(4500,8470)
  Bottom Layer w6: v1(4500,8470) 5080,8470 5080,8250 5260,8250 5260,8190 5720,8190 v1(5720,6710)
BUZ_C: LS1.2 Q2.3 | length 400
  Top Layer w6: LS1.2@5440,6790 5460,6790 Q2.3@5460,6410
CC1: J1.A5 R12.1 | length 700
  Top Layer w6: J1.A5@3200,8090 3220,8090 R12.1@3220,7410
CC2: J1.B5 R13.1 | length 320
  Top Layer w6: R13.1@3220,8310 3220,8150 3280,8150 3280,8090 J1.B5@3320,8090
CE: U4.8
CH_V3: C7.1 U6.4 | length 680
  Top Layer w6: v1(4180,7650) 4240,7650 4240,7670 4260,7670 4260,7690 U6.4@4320,7690
  Bottom Layer w6: v1(3920,7410) 3920,7630 4180,7630 v1(4180,7650)
CHRG: U4.7
CS: U7.2
EN: C1.1 R7.1 U1.3 | length 1880
  Top Layer w6: C1.1@4220,8950 4220,8850 5360,8850 5360,8290 5320,8290 R7.1@5320,8250
GND: C1.2 C2.2 C3.2 C4.2 C5.2 C6.2 C7.2 C8.2 C9.2 C11.2 C12.2 C13.2 C14.2 J1.1@3079.92,7904.9 J1.A1 J1.A12 J1.B1 J1.B12 LED1.2 LED2.2 LED3.2 Q1.6 Q1.7 Q1.8 Q2.2 Q3.2 R6.2 R12.2 R13.2 R16.2 SW1.2 SW2.2 SW3.2 U1.1 U1.15 U1.38 U1.39 U2.7 U2.18 U2.22 U2.30 U2.32 U2.33 U3.2 U3.10 U4.3 U4.9 U5.1 U6.1 | length 20806
  Top Layer w14: J1.1@3080,7910 3080,8090 3120,8090 3120,8130 3340,8130 3340,8090 3360,8090 ; R12.2@3280,7410 3280,7510 v1(3420,7510) ; R13.2@3280,8310 3280,8190 3300,8190 3300,8170 3360,8170 3360,8090 ; R6.2@3520,7010 3520,7210 C11.2@3540,7210 ; v1(3540,7510) 3540,7410 3520,7410 3520,7250 3540,7250 C11.2@3540,7210 ; v1(3580,7210) C11.2@3540,7210 ; v1(3700,8010) 3580,8010 3580,7970 3540,7970 3540,8070 3520,8070 3520,8110 3380,8110 3380,8090 3360,8090 ; v1(3800,8530) 3880,8530 3880,8550 3940,8550 3940,8510 3980,8510 Q1.7@3980,8430 ; U5.1@3816.9,7609.5 3980,7609.5 ; U2.32@3860,8730 3860,8810 U2.33@3920,8810 ; v1(3920,8010) 3920,8050 4040,8050 4040,8010 v1(4080,8010) ; v1(3940,7210) R16.2@3980,7210 ; Q1.8@3960,8430 Q1.7@3980,8430 ; 3980,7610 3980,7609.5 ; v1(4000,8710) 3960,8710 3960,8810 U2.33@3920,8810 ; v1(4040,7590) 4040,7609.5 ; v1(4040,7670) 4040,7609.5 ; C6.2 4077.6,7686.9 U6.1 4175,7609.5 4040,7609.5 ; v1(4080,7250) 4020,7250 4020,7210 ; v1(4100,8970) 4100,8930 4080,8930 4080,8890 4040,8890 ; v1(4180,7270) 4180,7310 v1(4220,7310) ; v1(4180,8950) 4180,8850 4040,8850 4040,8890 ; v1(4220,7210) 4020,7210 ; v1(4240,8230) 4240,8250 ; v1(4280,8250) 4240,8250 ; v1(4280,8950) U1.1@4460,8950 ; v1(4500,7130) 4280,7130 4280,7150 4260,7150 4260,7170 4020,7170 4020,7210 ; U1.15@4580,8250 4620,8250 ; v1(4620,7170) 4620,7250 4740,7250 v1(4740,7410) ; v1(4660,7650) 4660,8210 v1(4620,8210) 4620,8250 ; v1(4680,7310) v1(4720,7310) ; v1(4780,8650) 5140,8650 v1(5140,8670) ; v1(4960,7650) 4960,7610 5000,7610 5000,7310 v1(5040,7310) v1(5120,7310) ; v1(5100,8470) 5100,8390 4920,8390 4920,8370 4900,8370 4900,8290 4620,8290 4620,8250 ; v1(5140,8950) v1(5280,8950) ; v1(5380,6430) 5420,6430 v1(5420,6450) ; v1(5380,7150) v1(5380,7310) 5360,7310 5360,7610 v1(6180,7610) ; v1(5380,8950) 6240,8950 6240,8970 6320,8970 C9.2@6320,8950 ; v1(6320,7610) 6780,7610 U3.2@6780,8090 ; U2.33@3920,8810 3920,8890 4040,8890 ; R16.2@3980,7210 3980,7609.5 ; R16.2@3980,7210 4020,7210 ; 3980,7609.5 4040,7609.5 ; Q1.7@3980,8430 4020,8430 4020,8390 4080,8390 4080,8290 4240,8290 4240,8250
  Bottom Layer w14: v1(3420,7510) v1(3540,7510) ; v1(3580,7210) v1(3940,7210) ; v1(3700,8010) v1(3920,8010) ; v1(3800,8530) 3800,8750 3820,8750 3820,8770 3900,8770 3900,8850 4020,8850 4020,8750 4000,8750 v1(4000,8710) ; v1(3980,9110) 3980,9010 4000,9010 4000,8990 4100,8990 v1(4100,8970) ; v1(4040,7590) 4040,7170 v1(4620,7170) ; v1(4040,7670) 4120,7670 4120,7750 4180,7750 4180,7890 4200,7890 4200,7910 4240,7910 4240,8210 4280,8210 v1(4280,8250) ; v1(4080,7250) 4080,7270 v1(4180,7270) ; v1(4080,8010) 4080,8230 v1(4240,8230) ; v1(4180,8950) v1(4280,8950) ; v1(4220,7210) v1(4220,7310) ; v1(4500,7130) 4680,7130 v1(4680,7310) ; v1(4620,8210) 4780,8210 v1(4780,8050) ; v1(4660,7650) 4660,7490 4680,7490 4680,7470 4740,7470 v1(4740,7410) ; v1(4720,7310) v1(5040,7310) ; v1(4760,7610) 4760,7690 4960,7690 v1(4960,7650) ; v1(4780,8650) 4780,8510 5100,8510 v1(5100,8470) ; v1(5120,7310) v1(5380,7310) ; v1(5140,8670) v1(5140,8950) ; v1(5280,8950) v1(5380,8950) ; v1(5380,6430) v1(5380,7150) ; v1(5420,6450) 5540,6450 v1(5540,6430) ; v1(6180,7610) v1(6320,7610)
LED_G: R1.1 U1.11 | length 1220
  Top Layer w6: U1.11@4460,8450 4500,8450 v1(4500,8410)
  Bottom Layer w6: v1(4320,7610) 4320,7550 4440,7550 4440,7630 4480,7630 4480,8290 4520,8290 4520,8410 v1(4500,8410)
LED_R: R2.1 U1.12 | length 1540
  Top Layer w6: R2.1@4320,7410 4320,7570 4300,7570 4300,7590 4280,7590 4280,7630 4120,7630 4120,7850 4240,7850 4240,8190 4340,8190 4340,8410 U1.12@4460,8410
LED_S: R3.1 U1.8 | length 1660
  Top Layer w6: R3.1@4320,7210 4320,7350 4440,7350 4440,7630 4480,7630 4480,8290 4520,8290 4520,8610 U1.8@4460,8610
NC5V: U3.9
NLED1: LED1.1 R1.2 | length 480
  Top Layer w6: v1(4380,7510) R1.2@4380,7610 ; v1(4480,7510) 4480,7590 4500,7590 4500,7610 LED1.1@4660,7610
  Bottom Layer w6: v1(4380,7510) v1(4480,7510)
NLED2: LED2.1 R2.2 | length 720
  Top Layer w6: v1(4480,7410) 4480,7470 4500,7470 4500,7490 4520,7490 4520,7550 4820,7550 4820,7610 LED2.1@4900,7610
  Bottom Layer w6: v1(4380,7410) v1(4480,7410)
NLED3: LED3.1 R3.2 | length 1280
  Top Layer w6: v1(5200,7370) 5200,7610 LED3.1@5260,7610
  Bottom Layer w6: v1(4380,7210) 4380,7370 v1(5200,7370)
NQB2: Q2.1 R4.2 | length 580
  Top Layer w6: Q2.1@5540,6370 5780,6370 R4.2@5780,6710
NQB3: Q3.1 R5.2 | length 260
  Top Layer w6: Q3.1@5380,6370 5500,6370 5500,6350 5580,6350 R5.2@5580,6310
OC: Q1.5 U7.3 | length 340
  Top Layer w6: U7.3@3880,8250 4040,8250 Q1.5@4040,8430
OD: Q1.4 U7.1 | length 420
  Top Layer w6: U7.1@3820,8250 3860,8250 3860,8190 3900,8190 3900,8110 4040,8110 Q1.4@4040,8170
OSCIN: U2.1
PN_IRQ: U3.7
PN_RST: U3.8
PN_SS: U1.23 U3.6 | length 2360
  Top Layer w6: U1.23@4980,8250 5120,8250 v1(5120,8150) ; v1(5680,8150) 7180,8150 U3.6@7180,8090
  Bottom Layer w6: v1(5120,8150) v1(5680,8150)
PROG: R6.1 U4.2 | length 1160
  Top Layer w6: R6.1@3480,7010 3480,7350 3460,7350 3460,8030 U4.2@3580,8030
RC_RST: U1.13 U2.25 | length 1120
  Top Layer w6: v1(4380,8370) 4380,8350 U1.13@4460,8350
  Bottom Layer w6: v1(3860,8870) 3860,8750 3920,8750 3920,8570 4040,8570 4040,8490 4100,8490 4100,8470 4340,8470 4340,8370 v1(4380,8370)
RC_SS: U1.29 U2.29 | length 1600
  Top Layer w6: U2.29@3860,8790 3860,8750 3920,8750 3920,8650 4060,8650 4060,8670 4340,8670 4340,8650 4540,8650 4540,8630 4560,8630 4560,8510 U1.29@5140,8510
RLY: R5.1 U1.28 | length 2600
  Top Layer w6: U1.28@5140,8450 5200,8450 5200,8350 v1(5160,8350) ; v1(5160,8270) 5160,7250 5220,7250 5220,7050 5260,7050 5260,6350 5320,6350 5320,6310 R5.1@5520,6310
  Bottom Layer w6: v1(5160,8270) v1(5160,8350)
RLY_C: D1.1 K1.2 Q3.3 | length 840
  Top Layer w6: v1(5280,6450) 5280,6410 v1(5420,6410)
  Bottom Layer w6: v1(5120,6470) 5120,6450 v1(5280,6450) ; v1(5420,6410) v1(5900,6410)
SCL: R15.1 U1.36 U3.12 | length 4300
  Top Layer w6: v1(4060,8710) v1(4140,8710) ; R15.1@4220,8410 v1(4220,8510) ; v1(5100,8850) 5140,8850 5180,8850 5180,8810 5320,8810 v1(5320,8750) ; v1(5600,8590) 5600,8110 5620,8110 5620,8090 5640,8090 5640,8070 6220,8070 6220,7530 6240,7530 6240,7510 6280,7510 6280,7490 6300,7490 6300,7470 6320,7470 U3.12@6320,7410
  Bottom Layer w6: v1(4060,8710) 4060,8650 4080,8650 4080,8630 4180,8630 4180,8530 4200,8530 4200,8510 v1(4220,8510) ; v1(4140,8710) 4140,8850 v1(5100,8850) ; v1(5320,8750) 5600,8750 v1(5600,8590)
SDA: R14.1 U1.33 U3.11 | length 3720
  Top Layer w6: v1(4500,8710) 5320,8710 v1(5320,8650) ; v1(5640,8390) 5640,8130 5660,8130 5660,8110 6260,8110 6260,7550 6320,7550 U3.11@6320,7510
  Bottom Layer w6: v1(4220,8610) 4220,8550 4340,8550 4340,8570 4360,8570 4360,8590 4380,8590 4380,8810 4500,8810 v1(4500,8710) ; v1(5320,8650) 5360,8650 5360,8550 5640,8550 v1(5640,8390)
SPI_MISO: U1.31 U2.26 U3.4 | length 4120
  Top Layer w6: v1(4340,8610) 4340,8590 v1(4420,8590) ; v1(4600,8590) 4840,8590 4840,8610 5240,8610 v1(5240,8590)
  Bottom Layer w6: v1(3860,8850) 3860,8950 4080,8950 4080,8930 4100,8930 4100,8670 4340,8670 v1(4340,8610) ; v1(4420,8590) v1(4600,8590) ; v1(5240,8590) 5240,8330 5260,8330 5260,8310 6980,8310 v1(6980,8090)
SPI_MOSI: U1.37 U2.27 U3.3 | length 4120
  Top Layer w6: U2.27@3860,8830 v1(3860,8990) ; v1(3960,8990) 3960,9010 4520,9010 4520,8910 5260,8910 5260,8890 6880,8890 v1(6880,8190)
  Bottom Layer w6: v1(3860,8990) v1(3960,8990) ; v1(6880,8090) v1(6880,8190)
SPI_SCK: U1.30 U2.28 U3.5 | length 4060
  Top Layer w6: U2.28@3860,8810 3860,8770 3820,8770 3820,8750 3800,8750 3800,8570 4040,8570 4040,8550 v1(4420,8550) ; v1(4600,8550) 5280,8550 v1(5280,8350)
  Bottom Layer w6: v1(4420,8550) v1(4600,8550) ; v1(5280,8350) 7080,8350 v1(7080,8090)
STDBY: U4.6
SW1: R8.1 SW1.1 U1.9 | length 2000
  Top Layer w6: v1(4280,7730) 4340,7730 4340,8150 4360,8150 4360,8170 4380,8170 4380,8310 v1(4480,8310) ; U1.9@4460,8550 4500,8550 v1(4500,8490) ; v1(4520,7410) 4520,7310 4580,7310 R8.1@4580,7110
  Bottom Layer w6: v1(4280,7730) 4280,7530 4300,7530 4300,7510 4340,7510 4340,7490 4360,7490 4360,7470 4520,7470 v1(4520,7410) ; v1(4480,8310) 4500,8310 v1(4500,8490)
SW2: R9.1 SW2.1 U1.26 | length 1580
  Top Layer w6: R9.1@4920,7110 4920,7310 4860,7310 4860,7570 4920,7570 4920,7590 4940,7590 4940,8350 U1.26@5140,8350
SW3: R10.1 SW3.1 U1.16 | length 1840
  Top Layer w6: U1.16@4620,8250 4900,8250 v1(4900,7650) ; v1(5220,7310) 5280,7310 R10.1@5280,7110
  Bottom Layer w6: v1(4900,7650) 4940,7650 4940,7550 5240,7550 5240,7350 5220,7350 v1(5220,7310)
TEMP: R16.1 U4.1 | length 1200
  Top Layer w6: U4.1@3580,8070 3760,8070 3760,7550 3860,7550 3860,7350 3920,7350 R16.1@3920,7210
UART_RX: U1.34 U6.3 | length 1920
  Top Layer w6: v1(4420,8690) 4420,8750 U1.34@5140,8750
  Bottom Layer w6: v1(4280,7690) 4280,8190 4340,8190 4340,8330 4400,8330 4400,8350 4420,8350 v1(4420,8690)
UART_TX: U1.35 U6.2 | length 2040
  Top Layer w6: U6.2@4220,7690 4220,7730 v1(4320,7730) ; v1(4460,8790) 4520,8790 4520,8810 U1.35@5140,8810
  Bottom Layer w6: v1(4320,7730) 4320,8150 4360,8150 4360,8170 4380,8170 4380,8290 4420,8290 4420,8310 4440,8310 4440,8330 4460,8330 v1(4460,8790)
USB_DN: J1.A7 J1.B7 U6.6 | length 1613.4
  Top Layer w6: J1.B7@3220,8090 J1.A7@3260,8090 ; J1.A7 4425,8095.1 U6.6
USB_DP: J1.A6 J1.B6 U6.5 | length 1543.7
  Top Layer w6: J1.A6@3240,8090 J1.B6@3280,8090 ; J1.B6 4375,8095.1 U6.5
VBAT: C12.1 U4.5 U5.3 U7.5 | length 1460
  Top Layer w14: v1(3780,7750) 3780,7790 3820,7790 3820,7930 3880,7930 v1(3880,8090)
  Bottom Layer w14: v1(3380,7410) 3380,7650 3640,7650 3640,7750 v1(3780,7750) ; v1(3860,8350) 3860,8130 3880,8130 v1(3880,8090)
VBUS: C6.1 C11.1 J1.A4 J1.A9 J1.B4 J1.B9 U4.4 | length 1960
  Top Layer w14: 3140,8090 v1(3160,8090) ; v1(3300,8090) v1(3360,8090) ; v1(3500,7470) 3500,7890 3540,7890 3540,7930 ; v1(3500,7990) 3500,7930 3540,7930 ; v1(3720,7950) 3720,7930 3540,7930
  Bottom Layer w14: v1(3160,8090) v1(3300,8090) ; v1(3360,8090) 3360,7990 v1(3500,7990) ; v1(3420,7210) 3420,7470 v1(3500,7470) ; v1(3720,7950) 4020,7950 v1(4020,8010)
VMID: C4.1 U2.24 | length 260
  Top Layer w6: U2.24@3880,8890 3920,8890 C4.1@3920,9110
pads on no net: DS1.1 DS1.2 DS1.3 DS1.4 DS1.5 DS1.6 DS1.7 J1.1@3079.92,8069.46 J1.1@3420.07,7904.9 J1.1@3420.07,8069.46 J1.A8 J1.B8 K1.3 K1.4 K1.5 LS1.3 U1.4 U1.5 U1.6 U1.7 U1.14 U1.17 U1.18 U1.19 U1.20 U1.21 U1.22 U1.24 U1.27 U1.32 U2.2 U2.3 U2.4 U2.9 U2.10 U2.11 U2.12 U2.13 U2.14 U2.15 U2.20 U2.21 U2.31 U6.7 U6.8 U6.9 U6.10 U6.11 U6.12 U6.13 U6.14 U6.15 U7.4

## Polygon pours and split planes (outlines as drawn)
GND on Bottom Layer (solid, pour order 4): 3030,6180 3030,3090 7694,3090 7694,6180
GND on Top Layer (solid, pour order 0): 3030,6180 3030,3090 7694,3090 7694,6180

## Keep-outs
Board Outline Layer:
  region: 4410,9280 4410,9160 5190,9160 5190,9280
  region: 7300,8450 7300,7050 7680,7050 7680,8450
  lines w10: 3000,3000 3000,6150 7724,6150 7724,3000 3000,3000

## Text inside footprints (layer, text, board x,y; h text height)
DS1: Top Silkscreen Layer "CS" at 4055.05,6702.36 h39.37 r90; Top Silkscreen Layer "RES" at 3858.25,6663.12 h39.37 r90; Top Silkscreen Layer "D1" at 3754.95,6720.27 h39.37 r90; Top Silkscreen Layer "DC" at 3956.65,6702.36 h39.37 r90; Top Silkscreen Layer "D0" at 3651.55,6702.36 h39.37 r90; Top Silkscreen Layer "VCC" at 3553.15,6663.12 h39.37 r90; Top Silkscreen Layer "GND" at 3454.65,6663.12 h39.37 r90